# EAGLE board soic16_breakout (EAGLE 9.6.2)
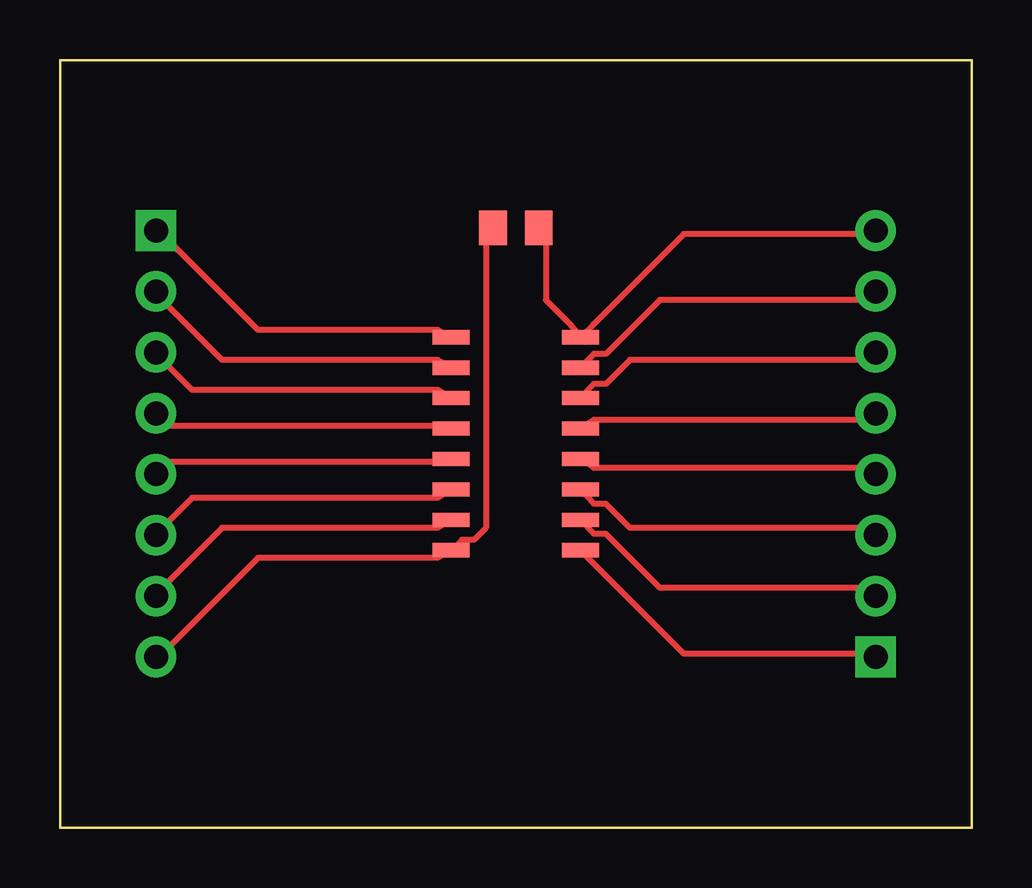
[diagram p0: board, top side]

Size 38 x 32 mm. Coordinates in mm from the lower left corner, seen from the top.
Outline: 0,0 38,0 38,32 0,32 0,0
Copper layers used: Top
Design rules "eh3d-kit": minimum track width 0.15mm, minimum drill 0.3mm, track to track 0.15mm, track to pad 0.15mm, pad to pad 0.15mm, via to via 0.15mm, smd to smd 0.15mm, copper to edge 0.3mm, drill to drill 0.25mm, minimum pad ring 0.15mm, minimum via ring 0.15mm

## Footprints (pad centres in the part's own frame; a part is rotated, then mirrored left to right if it is on the bottom)
CHIP-0805 = smd 1.15 x 1.45: 1 -0.95,0; 2 0.95,0
HDR-1X08 = drill 1 pad 1.7 square: 1 -8.89,0 | drill 1 pad 1.7: 2 -6.35,0; 3 -3.81,0; 4 -1.27,0; 5 1.27,0; 6 3.81,0; 7 6.35,0; 8 8.89,0
SOIC-16 = smd 1.55 x 0.6: 1 -2.7,4.445; 2 -2.7,3.175; 3 -2.7,1.905; 4 -2.7,0.635; 5 -2.7,-0.635; 6 -2.7,-1.905; 7 -2.7,-3.175; 8 -2.7,-4.445; 9 2.7,-4.445; 10 2.7,-3.175; 11 2.7,-1.905; 12 2.7,-0.635; 13 2.7,0.635; 14 2.7,1.905; 15 2.7,3.175; 16 2.7,4.445

## Placement (x,y rotation side)
C1  100n  [CHIP-0805]  19,25 0 top
J1  LEFT  [HDR-1X08]  4,16 270 top
J2  RIGHT  [HDR-1X08]  34,16 90 top
U1  GENERIC16  [SOIC-16]  19,16 0 top

## Library data of the parts
C1 J1 J2 U1 = eh3d-kit

## Nets
GND: C1.1 J1.8 U1.8
P1: J1.1 U1.1
P2: J1.2 U1.2
P3: J1.3 U1.3
P4: J1.4 U1.4
P5: J1.5 U1.5
P6: J1.6 U1.6
P7: J1.7 U1.7
P9: J2.1 U1.9
P10: J2.2 U1.10
P11: J2.3 U1.11
P12: J2.4 U1.12
P13: J2.5 U1.13
P14: J2.6 U1.14
P15: J2.7 U1.15
VCC: C1.2 J2.8 U1.16

## Tracks (layer width: path | path; a pad name or v marks a point on that pad's centre or on a via)
GND
  Top 0.25: J1.8 4.5,7.5 8.25,11.25 15.75,11.25 U1.8 16.75,12 17.25,12 17.75,12.5 17.75,24.5 C1.1
P1
  Top 0.25: U1.1 15.75,20.75 8.25,20.75 4.5,24.5 J1.1
P2
  Top 0.25: U1.2 15.75,19.5 6.75,19.5 4.5,21.75 J1.2
P3
  Top 0.25: U1.3 15.75,18.25 5.5,18.25 4.5,19.25 J1.3
P4
  Top 0.25: U1.4 15.75,16.75 4.5,16.75 J1.4
P5
  Top 0.25: U1.5 15.75,15.25 4.5,15.25 J1.5
P6
  Top 0.25: U1.6 15.75,13.75 5.5,13.75 4.5,12.75 J1.6
P7
  Top 0.25: U1.7 15.75,12.5 6.75,12.5 4.5,10.25 J1.7
P9
  Top 0.25: J2.1 33.5,7.25 26,7.25 22.25,11 U1.9
P10
  Top 0.25: J2.2 33.5,10 25,10 22.75,12.25 22.25,12.25 U1.10
P11
  Top 0.25: J2.3 33.5,12.5 23.75,12.5 22.75,13.5 22.25,13.5 U1.11
P12
  Top 0.25: J2.4 33.5,15 22.25,15 U1.12
P13
  Top 0.25: J2.5 33.5,17 22.25,17 U1.13
P14
  Top 0.25: J2.6 33.5,19.5 23.75,19.5 22.75,18.5 22.25,18.5 U1.14
P15
  Top 0.25: J2.7 33.5,22 25,22 22.75,19.75 22.25,19.75 U1.15
VCC
  Top 0.25: C1.2 20.25,24.5 20.25,22 21.25,21 U1.16 22.25,21 26,24.75 33.5,24.75 J2.8